# Altium PCB Electrode_Ribbon_PCB_v3.1.PcbDoc (part 5 of 5)
Units mil, origin at the board's own origin, x right, y up, seen from the top; angles counter-clockwise.
Board outline 8303.83 x 5482.84 mil, 2 copper layers (Top Layer, Bottom Layer), stack 3.556 mil thick; 265 components, 171 nets, 720 pads, 346 vias.
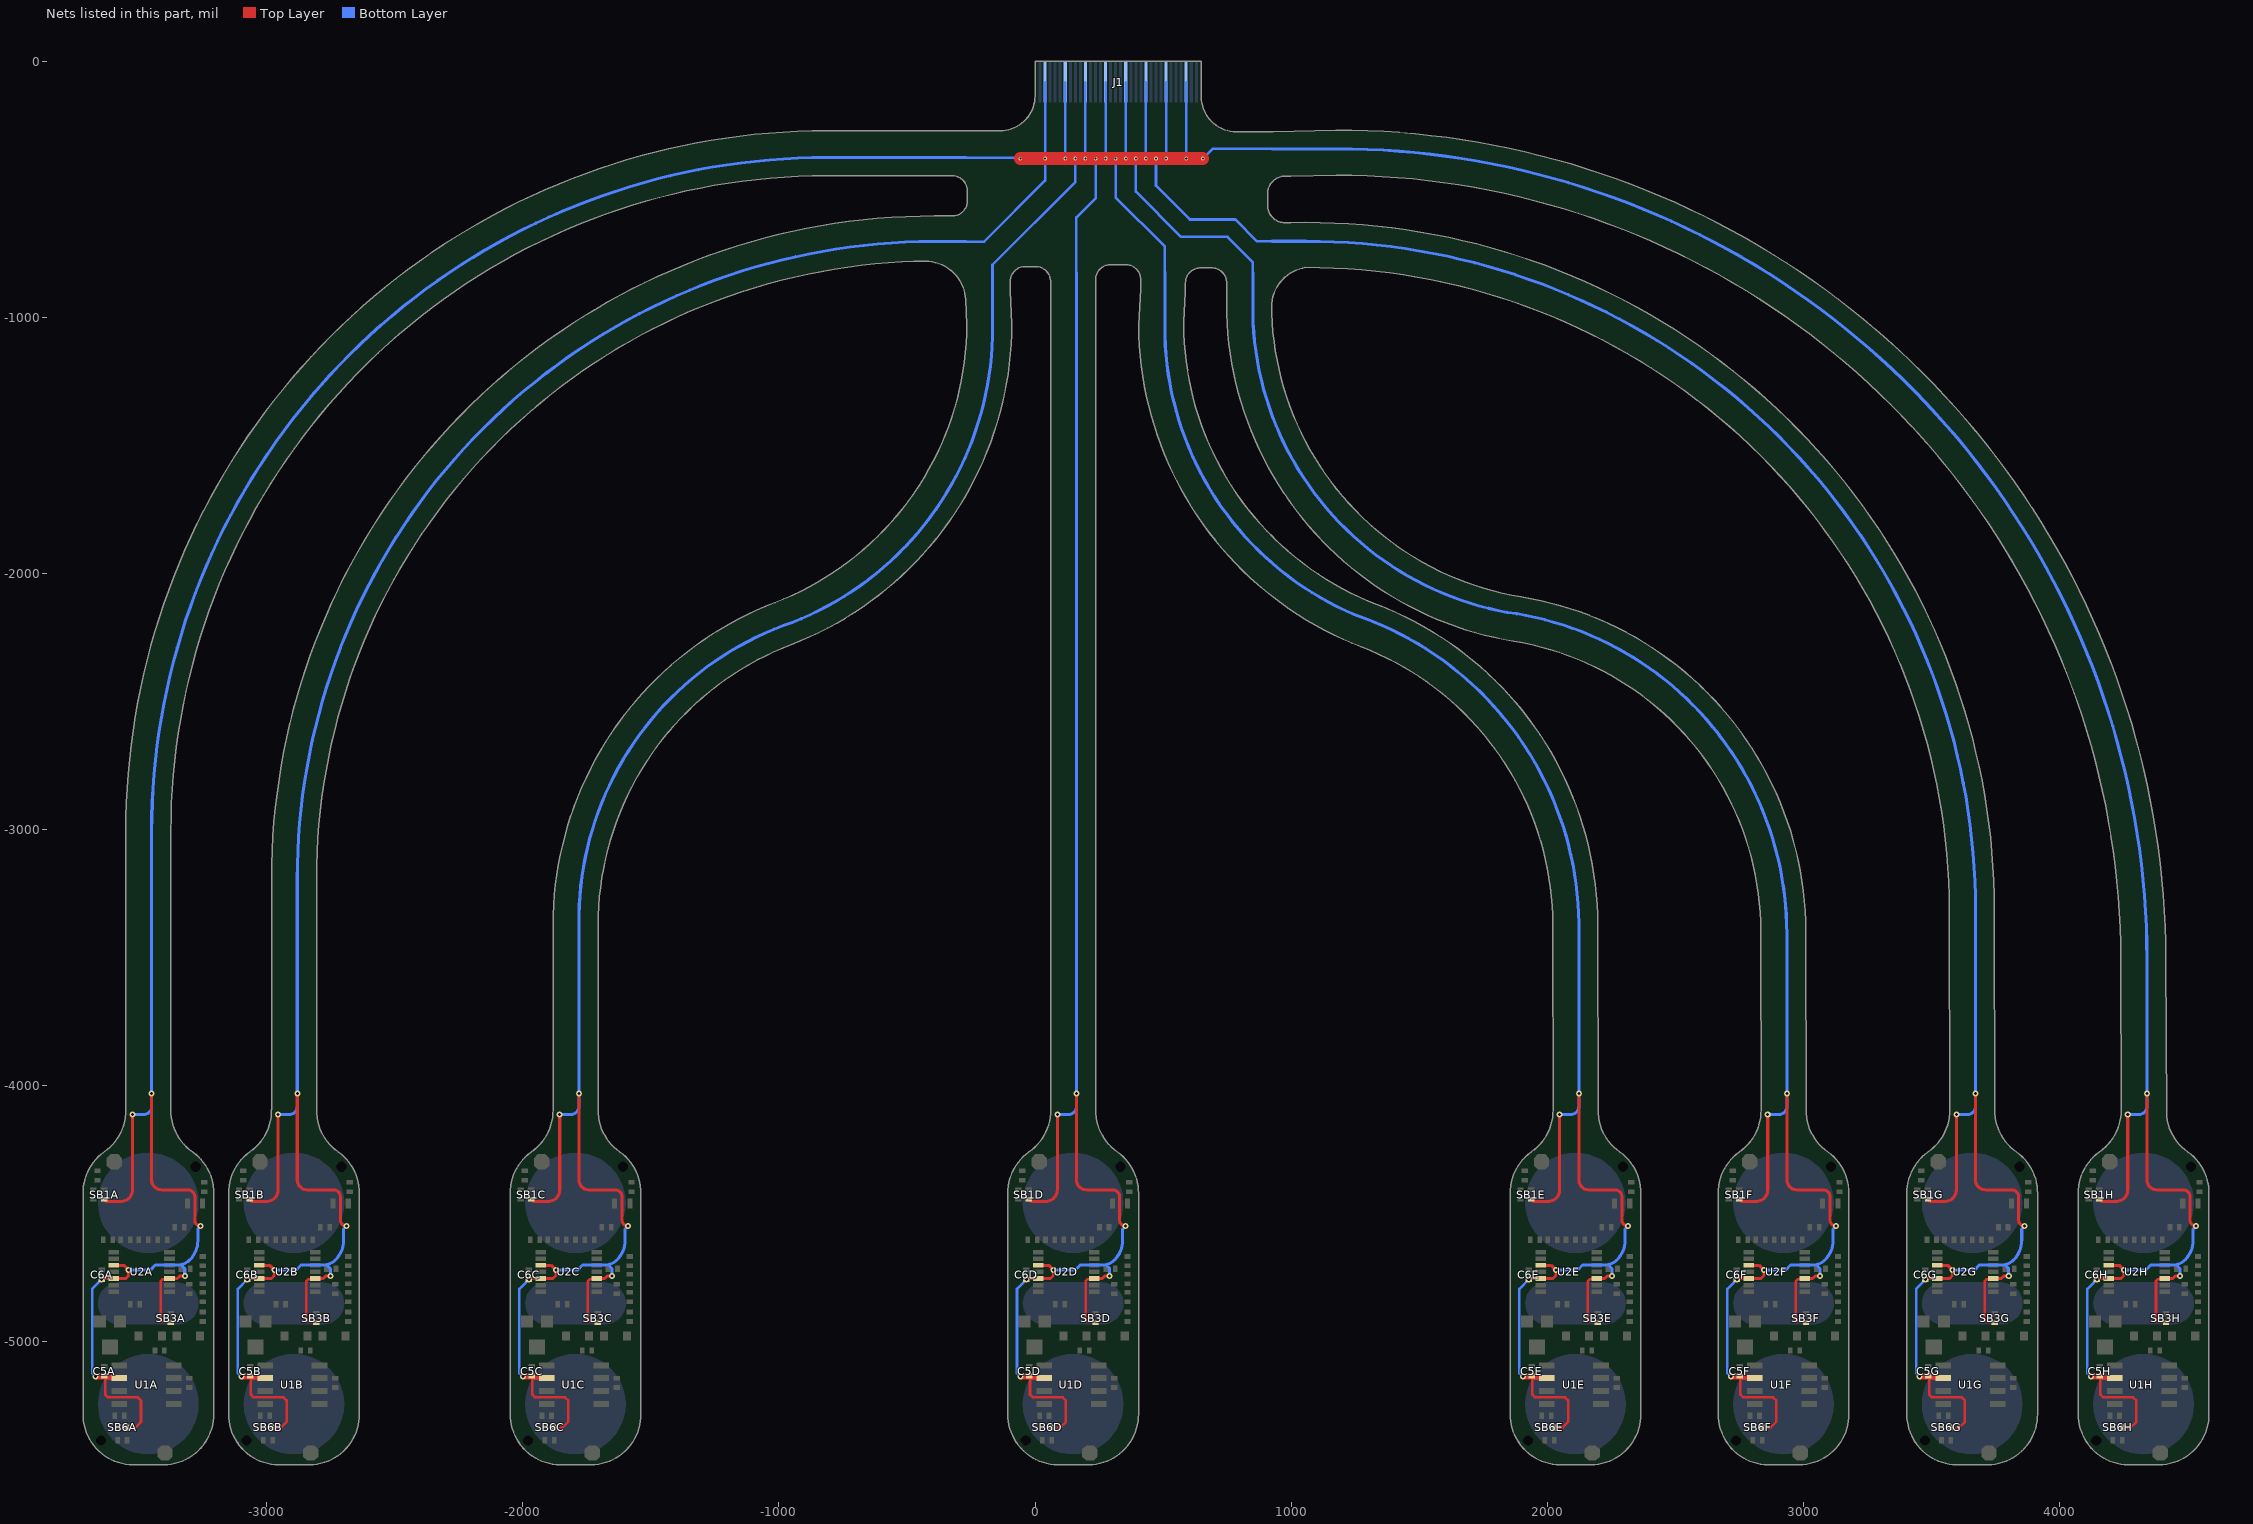
[diagram p4: the nets of this part, all layers, seen from the top]

## Via types
v1: diameter 23.62, hole 11.81, Top Layer to Bottom Layer, tented both sides, 304 vias
v2: diameter 13.78, hole 7.87, Top Layer to Bottom Layer, 42 vias

## Nets (pads, with @x,y where several pads share a name; then routed paths per layer and width w, separated by ;. In a path a pad name is that pad's centre, name@x,y a point inside that pad or via, vN(x,y) a via of type N, cw(c..) or ccw(c..) an arc to the next point about the centre after c; other vN are vias at no path point) (continued)
VREF_GND: C5A.2 C5B.2 C5C.2 C5D.2 C5E.2 C5F.2 C5G.2 C5H.2 C6A.2 C6B.2 C6C.2 C6D.2 C6E.2 C6F.2 C6G.2 C6H.2 J1.2 J1.6 J1.10 J1.14 J1.18 J1.22 J1.26 J1.30 SB1A.1 SB1B.1 SB1C.1 SB1D.1 SB1E.1 SB1F.1 SB1G.1 SB1H.1 SB3A.2 SB3B.2 SB3C.2 SB3D.2 SB3E.2 SB3F.2 SB3G.2 SB3H.2 SB6A.2 SB6B.2 SB6C.2 SB6D.2 SB6E.2 SB6F.2 SB6G.2 SB6H.2 U1A.6 U1B.6 U1C.6 U1D.6 U1E.6 U1F.6 U1G.6 U1H.6 U2A.3 U2A.10 U2A.12 U2B.3 U2B.10 U2B.12 U2C.3 U2C.10 U2C.12 U2D.3 U2D.10 U2D.12 U2E.3 U2E.10 U2E.12 U2F.3 U2F.10 U2F.12 U2G.3 U2G.10 U2G.12 U2H.3 U2H.10 U2H.12 | length 67756
  Top Layer w10: C5A.2@-3636.37,-5127.78 -3631.87,-5132.28 C5A.2@-3631.87,-5136.28 ; C5A.2@-3634.89,-5140.57 -3634.89,-5139.35 C5A.2@-3634.89,-5136.28 ; C5A.2@-3631.87,-5140.57 -3631.87,-5142.28 -3631.87,-5208.78 -3620.87,-5219.78 -3503.89,-5219.78 -3491.89,-5231.78 -3491.89,-5315.28 -3514.14,-5337.53 -3525.39,-5337.53 ; U2A.3@-3379.64,-4755.37 -3382.86,-4758.6 -3408.14,-4758.6 -3414.89,-4765.35 -3414.89,-4918.43 -3409.03,-4924.28 -3379.89,-4924.28 SB3A.2@-3375.89,-4928.28 ; C5B.2@-3067.4,-5127.78 -3062.9,-5132.28 C5B.2@-3062.9,-5136.28 ; C5B.2@-3065.92,-5140.57 -3065.92,-5139.35 C5B.2@-3065.92,-5136.28 ; C5B.2@-3062.9,-5140.57 -3062.9,-5142.28 -3062.9,-5208.78 -3051.9,-5219.78 -2934.92,-5219.78 -2922.92,-5231.78 -2922.92,-5315.28 -2945.17,-5337.53 -2956.42,-5337.53 ; U2B.3@-2810.66,-4755.37 -2813.88,-4758.59 -2839.16,-4758.59 -2845.92,-4765.35 -2845.92,-4918.43 -2840.06,-4924.28 -2810.92,-4924.28 SB3B.2@-2806.92,-4928.28 ; C5C.2@-1967.61,-5127.78 -1963.11,-5132.28 C5C.2@-1963.11,-5136.28 ; C5C.2@-1966.13,-5140.57 -1966.13,-5139.35 C5C.2@-1966.13,-5136.28 ; C5C.2@-1963.11,-5140.57 -1963.11,-5142.28 -1963.11,-5208.78 -1952.11,-5219.78 -1835.13,-5219.78 -1823.13,-5231.78 -1823.13,-5315.28 -1845.38,-5337.53 -1856.63,-5337.53 ; U2C.3@-1710.88,-4755.37 -1714.1,-4758.6 -1739.38,-4758.6 -1746.13,-4765.35 -1746.13,-4918.43 -1740.27,-4924.28 -1711.13,-4924.28 SB3C.2@-1707.13,-4928.28 ; C5D.2@-24.13,-5127.78 -19.63,-5132.28 C5D.2@-19.63,-5136.28 ; C5D.2@-22.65,-5140.57 -22.65,-5139.35 C5D.2@-22.65,-5136.28 ; C5D.2@-19.63,-5140.57 -19.63,-5142.28 -19.63,-5208.78 -8.63,-5219.78 108.35,-5219.78 120.35,-5231.78 120.35,-5315.28 98.1,-5337.53 86.85,-5337.53 ; U2D.3@232.61,-4755.37 229.39,-4758.59 204.1,-4758.59 197.35,-4765.35 197.35,-4918.43 203.21,-4924.28 232.35,-4924.28 SB3D.2@236.35,-4928.28 ; C5E.2@1938.04,-5127.78 1942.54,-5132.28 C5E.2@1942.54,-5136.28 ; C5E.2@1939.52,-5140.57 1939.52,-5139.35 C5E.2@1939.52,-5136.28 ; C5E.2@1942.54,-5140.57 1942.54,-5142.28 1942.54,-5208.78 1953.54,-5219.78 2070.52,-5219.78 2082.52,-5231.78 2082.52,-5315.28 2060.27,-5337.53 2049.02,-5337.53 ; U2E.3@2194.77,-4755.37 2191.55,-4758.6 2166.27,-4758.6 2159.52,-4765.35 2159.52,-4918.43 2165.37,-4924.28 2194.52,-4924.28 SB3E.2@2198.52,-4928.28 ; C5F.2@2750.75,-5127.79 2755.25,-5132.29 C5F.2@2755.25,-5136.29 ; C5F.2@2752.23,-5140.57 2752.23,-5139.35 C5F.2@2752.23,-5136.29 ; C5F.2@2755.25,-5140.57 2755.25,-5142.29 2755.25,-5208.79 2766.25,-5219.79 2883.23,-5219.79 2895.23,-5231.79 2895.23,-5315.29 2872.98,-5337.54 2861.73,-5337.54 ; U2F.3@3007.48,-4755.38 3004.26,-4758.6 2978.98,-4758.6 2972.23,-4765.35 2972.23,-4918.43 2978.09,-4924.29 3007.23,-4924.29 SB3F.2@3011.23,-4928.29 ; C5G.2@3487.5,-5127.78 3492,-5132.28 C5G.2@3492,-5136.28 ; C5G.2@3488.98,-5140.57 3488.98,-5139.35 C5G.2@3488.98,-5136.28 ; C5G.2@3492,-5140.57 3492,-5142.28 3492,-5208.78 3503,-5219.78 3619.98,-5219.78 3631.98,-5231.78 3631.98,-5315.28 3609.73,-5337.53 3598.48,-5337.53 ; U2G.3@3744.23,-4755.37 3741.01,-4758.59 3715.73,-4758.59 3708.98,-4765.35 3708.98,-4918.43 3714.84,-4924.28 3743.98,-4924.28 SB3G.2@3747.98,-4928.28 ; C5H.2@4156.97,-5127.78 4161.47,-5132.28 C5H.2@4161.47,-5136.28 ; C5H.2@4158.45,-5140.57 4158.45,-5139.35 C5H.2@4158.45,-5136.28 ; C5H.2@4161.47,-5140.57 4161.47,-5142.28 4161.47,-5208.78 4172.47,-5219.78 4289.45,-5219.78 4301.45,-5231.78 4301.45,-5315.28 4279.2,-5337.53 4267.95,-5337.53 ; U2H.3@4413.71,-4755.38 4410.49,-4758.6 4385.2,-4758.6 4378.45,-4765.35 4378.45,-4918.43 4384.31,-4924.28 4413.45,-4924.28 SB3H.2@4417.45,-4928.28
  Top Layer w12: v1(-3645.89,-4759.28) -3642.39,-4759.28 -3638.48,-4755.37 U2A.12@-3599.12,-4755.37 -3551.48,-4755.37 -3539.89,-4743.78 v1(-3539.89,-4722.78) -3558.48,-4704.19 U2A.10@-3599.12,-4704.19 ; SB1A.1@-3635.89,-4446.28 -3627.26,-4454.92 -3571.37,-4454.92 ccw(c-3571.37,-4408.71) -3559.93,-4453.48 ccw(c-3571.37,-4408.71) -3526.6,-4420.14 ccw(c-3571.37,-4408.71) -3525.16,-4408.71 v1(-3525.16,-4114.66) ; v1(-3450.17,-4033) -3450.45,-4033.28 -3450.45,-4370.28 ccw(c-3411.82,-4370.28) -3411.82,-4408.92 -3309.62,-4408.92 cw(c-3309.62,-4436.78) -3298.03,-4411.44 cw(c-3309.62,-4436.78) -3284.28,-4425.19 cw(c-3309.62,-4436.78) -3281.76,-4436.78 -3281.76,-4527.92 ccw(c-3258.89,-4527.92) v1(-3258.89,-4550.78) ; U2A.3@-3380.62,-4755.37 -3379.64,-4755.37 -3349.48,-4755.37 -3340.48,-4746.37 v1(-3320.57,-4746.37) ; v1(-3076.92,-4759.28) -3073.42,-4759.28 -3069.51,-4755.37 U2B.12@-3030.15,-4755.37 -2982.51,-4755.37 -2970.92,-4743.78 v1(-2970.92,-4722.78) -2989.51,-4704.19 U2B.10@-3030.15,-4704.19 ; SB1B.1@-3066.92,-4446.28 -3058.28,-4454.92 -3002.4,-4454.92 ccw(c-3002.4,-4408.71) -2990.96,-4453.48 ccw(c-3002.4,-4408.71) -2957.62,-4420.14 ccw(c-3002.4,-4408.71) -2956.19,-4408.71 v1(-2956.19,-4114.66) ; v1(-2881.19,-4033) -2881.47,-4033.28 -2881.47,-4370.28 ccw(c-2842.84,-4370.28) -2842.84,-4408.92 -2740.65,-4408.92 cw(c-2740.65,-4436.78) -2729.06,-4411.44 cw(c-2740.65,-4436.78) -2715.3,-4425.19 cw(c-2740.65,-4436.78) -2712.78,-4436.78 -2712.78,-4527.92 ccw(c-2689.92,-4527.92) v1(-2689.92,-4550.78) ; U2B.3@-2811.64,-4755.37 -2810.66,-4755.37 -2780.51,-4755.37 -2771.5,-4746.37 v1(-2751.59,-4746.37) ; v1(-1977.13,-4759.28) -1973.63,-4759.28 -1969.72,-4755.37 U2C.12@-1930.36,-4755.37 -1882.72,-4755.37 -1871.13,-4743.78 v1(-1871.13,-4722.78) -1889.72,-4704.19 U2C.10@-1930.36,-4704.19 ; SB1C.1@-1967.13,-4446.28 -1958.5,-4454.92 -1902.61,-4454.92 ccw(c-1902.61,-4408.71) -1891.17,-4453.48 ccw(c-1902.61,-4408.71) -1857.84,-4420.14 ccw(c-1902.61,-4408.71) -1856.4,-4408.71 v1(-1856.4,-4114.66) ; v1(-1781.41,-4033) -1781.69,-4033.28 -1781.69,-4370.28 ccw(c-1743.06,-4370.28) -1743.06,-4408.92 -1640.86,-4408.92 cw(c-1640.86,-4436.78) -1629.27,-4411.44 cw(c-1640.86,-4436.78) -1615.52,-4425.19 cw(c-1640.86,-4436.78) -1613,-4436.78 -1613,-4527.92 ccw(c-1590.13,-4527.92) v1(-1590.13,-4550.78) ; U2C.3@-1711.86,-4755.37 -1710.88,-4755.37 -1680.72,-4755.37 -1671.72,-4746.37 v1(-1651.81,-4746.37) ; v1(-33.65,-4759.28) -30.15,-4759.28 -26.24,-4755.37 U2D.12@13.12,-4755.37 60.76,-4755.37 72.35,-4743.78 v1(72.35,-4722.78) 53.76,-4704.19 U2D.10@13.12,-4704.19 ; SB1D.1@-23.65,-4446.28 -15.02,-4454.92 40.87,-4454.92 ccw(c40.87,-4408.7) 52.31,-4453.48 ccw(c40.87,-4408.7) 85.64,-4420.14 ccw(c40.87,-4408.7) 87.08,-4408.7 v1(87.08,-4114.66) ; v1(162.07,-4033) 161.79,-4033.28 161.79,-4370.28 ccw(c200.43,-4370.28) 200.43,-4408.91 302.62,-4408.91 cw(c302.62,-4436.78) 314.21,-4411.44 cw(c302.62,-4436.78) 327.96,-4425.19 cw(c302.62,-4436.78) 330.49,-4436.78 330.49,-4527.92 ccw(c353.35,-4527.92) v1(353.35,-4550.78) ; U2D.3@231.62,-4755.37 232.61,-4755.37 262.76,-4755.37 271.77,-4746.37 v1(291.68,-4746.37) ; v1(1928.52,-4759.28) 1932.02,-4759.28 1935.92,-4755.37 U2E.12@1975.28,-4755.37 2022.92,-4755.37 2034.52,-4743.78 v1(2034.52,-4722.78) 2015.93,-4704.19 U2E.10@1975.28,-4704.19 ; SB1E.1@1938.52,-4446.28 1947.15,-4454.92 2003.04,-4454.92 ccw(c2003.04,-4408.71) 2014.47,-4453.48 ccw(c2003.04,-4408.71) 2047.81,-4420.14 ccw(c2003.04,-4408.71) 2049.25,-4408.71 v1(2049.25,-4114.66) ; v1(2124.24,-4033) 2123.96,-4033.28 2123.96,-4370.28 ccw(c2162.59,-4370.28) 2162.59,-4408.92 2264.78,-4408.92 cw(c2264.78,-4436.78) 2276.38,-4411.44 cw(c2264.78,-4436.78) 2290.13,-4425.19 cw(c2264.78,-4436.78) 2292.65,-4436.78 2292.65,-4527.92 ccw(c2315.52,-4527.92) v1(2315.52,-4550.78) ; U2E.3@2193.79,-4755.37 2194.77,-4755.37 2224.92,-4755.37 2233.93,-4746.37 v1(2253.84,-4746.37) ; v1(2741.23,-4759.29) 2744.73,-4759.29 2748.64,-4755.38 U2F.12@2788,-4755.38 2835.64,-4755.38 2847.23,-4743.79 v1(2847.23,-4722.79) 2828.64,-4704.2 U2F.10@2788,-4704.2 ; SB1F.1@2751.23,-4446.29 2759.86,-4454.92 2815.75,-4454.92 ccw(c2815.75,-4408.71) 2827.19,-4453.48 ccw(c2815.75,-4408.71) 2860.52,-4420.15 ccw(c2815.75,-4408.71) 2861.96,-4408.71 v1(2861.96,-4114.67) ; v1(2936.95,-4033.01) 2936.67,-4033.29 2936.67,-4370.29 ccw(c2975.3,-4370.29) 2975.3,-4408.92 3077.5,-4408.92 cw(c3077.5,-4436.79) 3089.09,-4411.45 cw(c3077.5,-4436.79) 3102.84,-4425.2 cw(c3077.5,-4436.79) 3105.37,-4436.79 3105.37,-4527.93 ccw(c3128.23,-4527.93) v1(3128.23,-4550.79) ; U2F.3@3006.5,-4755.38 3007.48,-4755.38 3037.64,-4755.38 3046.64,-4746.38 v1(3066.56,-4746.38) ; v1(3477.98,-4759.28) 3481.48,-4759.28 3485.39,-4755.37 U2G.12@3524.75,-4755.37 3572.39,-4755.37 3583.98,-4743.78 v1(3583.98,-4722.78) 3565.39,-4704.19 U2G.10@3524.75,-4704.19 ; SB1G.1@3487.98,-4446.28 3496.61,-4454.92 3552.5,-4454.92 ccw(c3552.5,-4408.71) 3563.94,-4453.48 ccw(c3552.5,-4408.71) 3597.27,-4420.14 ccw(c3552.5,-4408.71) 3598.71,-4408.71 v1(3598.71,-4114.66) ; v1(3673.7,-4033) 3673.42,-4033.28 3673.42,-4370.28 ccw(c3712.05,-4370.28) 3712.05,-4408.91 3814.25,-4408.91 cw(c3814.25,-4436.78) 3825.84,-4411.44 cw(c3814.25,-4436.78) 3839.59,-4425.19 cw(c3814.25,-4436.78) 3842.11,-4436.78 3842.11,-4527.92 ccw(c3864.98,-4527.92) v1(3864.98,-4550.78) ; U2G.3@3743.25,-4755.37 3744.23,-4755.37 3774.39,-4755.37 3783.39,-4746.37 v1(3803.3,-4746.37) ; v1(4147.45,-4759.28) 4150.95,-4759.28 4154.86,-4755.38 U2H.12@4194.22,-4755.38 4241.86,-4755.38 4253.45,-4743.78 v1(4253.45,-4722.78) 4234.86,-4704.19 U2H.10@4194.22,-4704.19 ; SB1H.1@4157.45,-4446.28 4166.08,-4454.92 4221.97,-4454.92 ccw(c4221.97,-4408.71) 4233.41,-4453.48 ccw(c4221.97,-4408.71) 4266.74,-4420.14 ccw(c4221.97,-4408.71) 4268.18,-4408.71 v1(4268.18,-4114.66) ; v1(4343.17,-4033) 4342.9,-4033.28 4342.9,-4370.28 ccw(c4381.53,-4370.28) 4381.53,-4408.92 4483.72,-4408.92 cw(c4483.72,-4436.78) 4495.31,-4411.44 cw(c4483.72,-4436.78) 4509.06,-4425.19 cw(c4483.72,-4436.78) 4511.59,-4436.78 4511.59,-4527.92 ccw(c4534.45,-4527.92) v1(4534.45,-4550.78) ; U2H.3@4412.72,-4755.38 4413.71,-4755.38 4443.86,-4755.38 4452.87,-4746.37 v1(4472.78,-4746.37)
  Top Layer w20: v1(-3668.89,-5138.78) -3668.33,-5139.35 -3634.89,-5139.35 -3634.81,-5139.35 -3631.87,-5142.28 U1A.6@-3602.89,-5142.28 ; v1(-3099.92,-5138.78) -3099.35,-5139.35 -3065.92,-5139.35 -3065.83,-5139.35 -3062.9,-5142.28 U1B.6@-3033.92,-5142.28 ; v1(-2000.13,-5138.78) -1999.57,-5139.35 -1966.13,-5139.35 -1966.05,-5139.35 -1963.11,-5142.28 U1C.6@-1934.13,-5142.28 ; v1(-56.65,-5138.78) -56.08,-5139.35 -22.65,-5139.35 -22.56,-5139.35 -19.63,-5142.28 U1D.6@9.35,-5142.28 ; v1(1905.52,-5138.78) 1906.08,-5139.35 1939.52,-5139.35 1939.6,-5139.35 1942.54,-5142.28 U1E.6@1971.52,-5142.28 ; v1(2718.23,-5138.79) 2718.79,-5139.35 2752.23,-5139.35 2752.31,-5139.35 2755.25,-5142.29 U1F.6@2784.23,-5142.29 ; v1(3454.98,-5138.78) 3455.54,-5139.35 3488.98,-5139.35 3489.06,-5139.35 3492,-5142.28 U1G.6@3520.98,-5142.28 ; v1(4124.45,-5138.78) 4125.02,-5139.35 4158.45,-5139.35 4158.54,-5139.35 4161.47,-5142.28 U1H.6@4190.45,-5142.28
  Top Layer w50: v2(-57.25,-381.11) -56.95,-380.81 v2(39.64,-380.81) v2(118.31,-380.81) ; v2@118.31,-381.11 v2(236.42,-381.11) v2(315.16,-381.11) 655.05,-381.11 v2@655.05,-380.81
  Bottom Layer w10: v1(-3668.89,-5138.78) -3670.57,-5137.1 -3682.57,-5125.1 -3682.57,-4795.97 v1(-3645.89,-4759.28) ; v1(-3099.92,-5138.78) -3101.6,-5137.1 -3113.6,-5125.1 -3113.6,-4795.96 v1(-3076.92,-4759.28) ; v1(-2000.13,-5138.78) -2001.81,-5137.1 -2013.81,-5125.1 -2013.81,-4795.97 v1(-1977.13,-4759.28) ; -269.25,-705.11 -198.16,-705.11 39.64,-467.31 v2(39.64,-380.81) 39.54,-380.71 39.54,-83.12 J1.2@39.44,-83.01 ; -269.25,-377.11 -61.25,-377.11 v2(-57.25,-381.11) ; -165.95,-826.74 -165.95,-795.86 157.68,-472.23 v2@157.68,-380.95 ; v1(-56.65,-5138.78) -58.33,-5137.1 -70.33,-5125.1 -70.33,-4795.96 v1(-33.65,-4759.28) ; v2@118.18,-380.81 J1.6@118.18,-83.01 ; 161.55,-826.74 161.55,-611.28 236.42,-536.4 v2@236.42,-381.25 ; v2@196.92,-380.81 J1.10@196.92,-83.01 ; v2@275.66,-380.81 J1.14@275.66,-83.01 ; v2@315.03,-381.11 315.16,-381.25 315.16,-532.44 506.91,-724.19 506.91,-823.9 ; v2@354.4,-380.81 J1.18@354.4,-83.01 ; v2@393.9,-380.95 393.9,-510.26 570.75,-687.11 751.75,-687.11 850.85,-786.21 850.85,-826.74 ; v2@433.14,-380.81 J1.22@433.14,-83.01 ; v2@472.51,-380.81 472.51,-486.91 604.71,-619.11 782.8,-619.11 867.8,-704.11 926.47,-704.11 ; v2@511.88,-380.81 J1.26@511.88,-83.01 ; v2@590.62,-380.81 J1.30@590.62,-83.01 ; v2(655.75,-380.81) 693.46,-343.11 925.05,-343.11 ; v1(1905.52,-5138.78) 1903.83,-5137.1 1891.83,-5125.1 1891.83,-4795.97 v1(1928.52,-4759.28) ; v1(2718.23,-5138.79) 2716.55,-5137.11 2704.55,-5125.11 2704.55,-4795.97 v1(2741.23,-4759.29) ; v1(3454.98,-5138.78) 3453.3,-5137.1 3441.3,-5125.1 3441.3,-4795.96 v1(3477.98,-4759.28) ; v1(4124.45,-5138.78) 4122.77,-5137.1 4110.77,-5125.1 4110.77,-4795.97 v1(4147.45,-4759.28)
  Bottom Layer w12: v1(-3539.89,-4722.78) -3539.7,-4722.6 -3455.7,-4722.6 -3435.89,-4702.78 -3357.93,-4702.78 ; v1(-3525.16,-4114.66) -3481.05,-4114.66 ccw(c-3481.05,-4083.78) -3450.17,-4083.78 v1(-3450.17,-4033) ; v1@-3450.45,-4032.72 -3450.45,-3009.11 cw(c-816.35,-3011.22) -814.25,-377.11 -269.25,-377.11 ; -3355.73,-4702.78 ccw(c-3355.73,-4596.94) -3335.18,-4700.77 ccw(c-3347.99,-4636.05) -3301.34,-4682.7 ccw(c-3377.26,-4606.78) -3269.89,-4606.78 -3269.89,-4561.78 v1(-3258.89,-4550.78) ; -3334.75,-4702.93 -3320.88,-4716.8 -3320.88,-4746.06 v1(-3320.57,-4746.37) ; v1(-2970.92,-4722.78) -2970.73,-4722.59 -2886.73,-4722.59 -2866.92,-4702.78 -2788.96,-4702.78 ; v1(-2956.19,-4114.66) -2912.08,-4114.66 ccw(c-2912.08,-4083.78) -2881.19,-4083.78 v1(-2881.19,-4033) ; v1@-2881.47,-4033 -2881.47,-3193.7 cw(c-395.57,-3191.02) -398.25,-705.11 -269.25,-705.11 ; -2786.76,-4702.78 ccw(c-2786.76,-4596.94) -2766.2,-4700.77 ccw(c-2779.01,-4636.05) -2732.36,-4682.7 ccw(c-2808.28,-4606.78) -2700.92,-4606.78 -2700.92,-4561.78 v1(-2689.92,-4550.78) ; -2765.77,-4702.93 -2751.9,-4716.8 -2751.9,-4746.06 v1(-2751.59,-4746.37) ; v1(-1871.13,-4722.78) -1870.94,-4722.6 -1786.94,-4722.6 -1767.13,-4702.78 -1689.17,-4702.78 ; v1(-1856.4,-4114.66) -1812.29,-4114.66 ccw(c-1812.29,-4083.78) -1781.41,-4083.78 v1(-1781.41,-4033) ; v1@-1781.47,-4033 -1781.47,-3373.08 cw(c-551.39,-3357.23) -948.32,-2192.83 ccw(c-1396.56,-1046.74) -165.95,-1039.43 -165.95,-826.74 ; -1686.97,-4702.78 ccw(c-1686.97,-4596.94) -1666.42,-4700.77 ccw(c-1679.23,-4636.05) -1632.58,-4682.7 ccw(c-1708.5,-4606.78) -1601.13,-4606.78 -1601.13,-4561.78 v1(-1590.13,-4550.78) ; -1665.99,-4702.93 -1652.12,-4716.8 -1652.12,-4746.06 v1(-1651.81,-4746.37) ; v1(72.35,-4722.78) 72.54,-4722.59 156.54,-4722.59 176.35,-4702.78 254.31,-4702.78 ; v1(87.08,-4114.66) 131.19,-4114.66 ccw(c131.19,-4083.78) 162.07,-4083.78 v1(162.07,-4033) ; v1@161.55,-4033 161.55,-826.74 ; 256.51,-4702.78 ccw(c256.51,-4596.94) 277.07,-4700.77 ccw(c264.25,-4636.05) 310.9,-4682.7 ccw(c234.99,-4606.78) 342.35,-4606.78 342.35,-4561.78 v1(353.35,-4550.78) ; 277.49,-4702.93 291.37,-4716.8 291.37,-4746.06 v1(291.68,-4746.37) ; 506.91,-823.9 506.91,-1034.67 ccw(c1725.55,-1041.4) 1247.45,-2162.35 cw(c836.36,-3382.75) 2124.05,-3368.16 v1@2124.05,-4033 ; 850.85,-826.74 850.85,-945.96 ccw(c2058.8,-964.26) 1844.37,-2153.17 cw(c1674.62,-3400.94) 2623.44,-2573 cw(c1666.48,-3408.05) 2936.55,-3408.87 v1@2936.55,-4033.01 ; 925.05,-343.11 1176.75,-343.11 cw(c1178.9,-3507.26) 4343.05,-3505.11 v1@4343.05,-4033 ; 926.47,-704.11 1057.75,-704.11 cw(c1060.15,-3317.51) 3673.55,-3315.11 v1@3673.55,-4033 ; v1(2034.52,-4722.78) 2034.7,-4722.59 2118.7,-4722.59 2138.52,-4702.78 2216.48,-4702.78 ; v1(2049.25,-4114.66) 2093.35,-4114.66 ccw(c2093.35,-4083.78) 2124.24,-4083.78 v1(2124.24,-4033) ; 2218.68,-4702.78 ccw(c2218.68,-4596.94) 2239.23,-4700.77 ccw(c2226.42,-4636.05) 2273.07,-4682.7 ccw(c2197.15,-4606.78) 2304.52,-4606.78 2304.52,-4561.78 v1(2315.52,-4550.78) ; 2239.66,-4702.93 2253.53,-4716.8 2253.53,-4746.06 v1(2253.84,-4746.37) ; v1(2847.23,-4722.79) 2847.42,-4722.6 2931.42,-4722.6 2951.23,-4702.79 3029.19,-4702.79 ; v1(2861.96,-4114.67) 2906.07,-4114.67 ccw(c2906.07,-4083.78) 2936.95,-4083.78 v1(2936.95,-4033.01) ; 3031.39,-4702.79 ccw(c3031.39,-4596.95) 3051.94,-4700.77 ccw(c3039.13,-4636.06) 3085.78,-4682.71 ccw(c3009.87,-4606.79) 3117.23,-4606.79 3117.23,-4561.79 v1(3128.23,-4550.79) ; 3052.37,-4702.93 3066.25,-4716.81 3066.25,-4746.07 v1(3066.56,-4746.38) ; v1(3583.98,-4722.78) 3584.17,-4722.59 3668.17,-4722.59 3687.98,-4702.78 3765.94,-4702.78 ; v1(3598.71,-4114.66) 3642.82,-4114.66 ccw(c3642.82,-4083.78) 3673.7,-4083.78 v1(3673.7,-4033) ; 3768.14,-4702.78 ccw(c3768.14,-4596.94) 3788.69,-4700.77 ccw(c3775.88,-4636.05) 3822.53,-4682.7 ccw(c3746.61,-4606.78) 3853.98,-4606.78 3853.98,-4561.78 v1(3864.98,-4550.78) ; 3789.12,-4702.93 3802.99,-4716.8 3802.99,-4746.06 v1(3803.3,-4746.37) ; v1(4253.45,-4722.78) 4253.64,-4722.6 4337.64,-4722.6 4357.45,-4702.78 4435.41,-4702.78 ; v1(4268.18,-4114.66) 4312.29,-4114.66 ccw(c4312.29,-4083.78) 4343.17,-4083.78 v1(4343.17,-4033) ; 4437.61,-4702.78 ccw(c4437.61,-4596.94) 4458.17,-4700.77 ccw(c4445.35,-4636.05) 4492.01,-4682.7 ccw(c4416.09,-4606.78) 4523.45,-4606.78 4523.45,-4561.78 v1(4534.45,-4550.78) ; 4458.6,-4702.93 4472.47,-4716.8 4472.47,-4746.06 v1(4472.78,-4746.37)
  Bottom Layer w15: v1@-3450.45,-4032.72 v1(-3450.17,-4033)
  other v2: 157.68,-380.81 197.05,-380.81 275.79,-380.81 354.53,-380.81 393.9,-380.81 433.27,-380.81 472.64,-380.81 512.01,-380.81 590.75,-380.81

## Polygon pours and split planes (outlines as drawn)
-VCC_3V3 on Top Layer "-VCC_3V3_L01_P000" (hatched 90Degree grid 20 track 5, pour order 0): -270.54,-316.41 cw(c-251.45,-316.41) -251.45,-297.31 -122.38,-297.31 ccw(c-105.68,-180.64) 11.03,-197.05 cw(c40.75,-201.11) 40.75,-171.11 607.76,-171.11 cw(c595.62,-215.75) 632.15,-187.38 ccw(c770.29,-164.62) 790.75,-303.11 908.32,-303.11 cw(c910.54,-323.32) 930.75,-321.11 930.75,-391.11 930.75,-421.11 cw(c900.82,-421.14) 922,-442.29 ccw(c922.13,-483.67) 880.75,-483.68 880.75,-592.97 ccw(c920.72,-597.03) 916.86,-637.01 cw(c907.51,-659.63) 930.13,-650.28 930.13,-675.87 cw(c885.68,-680.49) 930.37,-680.73 930.37,-717.21 cw(c912.09,-720.98) 930.75,-721.11 930.75,-781.11 cw(c880.77,-781.13) 880.75,-831.11 800.75,-831.11 cw(c800.75,-801.12) 770.75,-801.11 ccw(c740.77,-801.1) 740.75,-771.11 590.75,-771.11 ccw(c600.73,-797.56) 572.53,-799.34 cw(c540.77,-799.36) 540.75,-831.11 470.75,-831.11 cw(c470.75,-799.35) 438.98,-799.34 ccw(c409.81,-798.86) 418.82,-771.11 250.75,-771.11 ccw(c250.74,-801.1) 220.75,-801.11 cw(c190.77,-801.13) 190.75,-831.11 110.75,-831.11 cw(c110.75,-801.12) 80.75,-801.11 ccw(c50.77,-801.1) 50.75,-771.11 -79.25,-771.11 ccw(c-79.26,-801.1) -109.25,-801.11 cw(c-139.23,-801.13) -139.25,-831.11 -219.25,-831.11 cw(c-219.25,-781.12) -269.25,-781.11 -269.25,-641.11 cw(c-249.25,-641.11) -263.39,-626.97 ccw(c-266.82,-596.4) -236.25,-592.97 -236.25,-468.11 ccw(c-268.03,-467.3) -258.04,-437.11 cw(c-248.12,-416.69) -270.54,-413.11 -270.54,-391.11

## Other copper
Top Layer:
  rectangle net VREF_GND: 1925.5,-4475.78 1985.52,-4436.78
  rectangle net IN2NH: 4522.45,-4751.78 4561.47,-4695.78
  rectangle net NetC1H_2: 4485.45,-4730.78 4516.45,-4708.78
  rectangle net NetD1H_2: 4474.45,-4788.78 4557.45,-4764.78
  rectangle net NetC3H_2: 4514.47,-4857.78 4561.47,-4837.78
  rectangle net NetC3H_2: 4514.47,-4896.78 4561.47,-4837.78
  rectangle net NetR3H_1: 4469.47,-4828.28 4558.47,-4798.78
  rectangle net RECTH: 4526.45,-4679.78 4557.45,-4641.78
  rectangle net RECTH: 4391.45,-4661.78 4557.45,-4641.78
  rectangle net NetD1H_2: 4500.45,-5008.78 4548.45,-4957.78
  rectangle net NetLED1H_2: 4530.47,-4486.78 4561.47,-4398.78
  rectangle net MeasureH: 4459.45,-4584.78 4493.45,-4442.78
  rectangle net -VCC_3V3: 4135.45,-4736.78 4163.45,-4710.78
  rectangle net NetR11H_1: 4098.23,-4419.42 4176.45,-4399.92
  rectangle net VREF_GND: 4144.44,-4475.78 4204.45,-4436.78
  rectangle net -VCC_3V3: 4131.45,-5113.78 4268.45,-5080.78
  region net VCC_3V3: 4227.45,-5249.78 4227.45,-5307.78 4278.45,-5307.78 4278.45,-5249.78
  rectangle net VREF_GND: 4237.45,-5356.78 4298.45,-5318.28
  rectangle net *rgH: 4396.47,-5156.78 4508.45,-5125.78
  rectangle net #rgH: 4396.47,-5206.78 4509.45,-5170.78
  rectangle net VREF_GND: 4112.45,-5162.78 4249.45,-5121.78
  rectangle net VCC_3V3: 4102.45,-5265.78 4278.45,-5231.78
  rectangle net -VCC_3V3: 4078.45,-4531.72 4131.23,-4434.78
  region net -VCC_3V3: 4235.82,-5373.78 4235.82,-5471.78 4271.45,-5471.78 4271.45,-5373.78
  rectangle net NetC1H_2: 4179.45,-5408.78 4219.45,-5277.78
  rectangle net Measure*H: 4148.45,-5039.78 4211.45,-4985.78
  rectangle net VREF_GND: 4372.45,-4937.78 4432.45,-4911.78
  rectangle net SMOOTHH: 4248.47,-4618.78 4303.47,-4590.78
  rectangle net Measure*H: 4162.45,-4858.78 4233.45,-4797.78
  rectangle net Measure*H: 4192.45,-5052.78 4246.45,-4891.78
  rectangle net IN2PH: 4276.45,-5050.78 4356.45,-4964.78
  rectangle net IN2PH: 4276.45,-5050.78 4364.45,-5023.78
  rectangle net NetC4H_2: 4319.47,-4617.78 4375.47,-4571.78
  rectangle net RECTH: 4390.57,-4660.4 4421.57,-4591.78
  rectangle net OUT1H: 4367.45,-5000.78 4458.45,-4944.78
  rectangle net NetR3H_1: 4469.47,-4944.78 4499.47,-4798.78
  rectangle net IN2NG: 3852.98,-4751.78 3892,-4695.78
  rectangle net NetC1G_2: 3815.98,-4730.78 3846.98,-4708.78
  rectangle net NetD1G_2: 3804.98,-4788.78 3887.98,-4764.78
  rectangle net NetC3G_2: 3845,-4857.78 3892,-4837.78
  rectangle net NetC3G_2: 3845,-4896.78 3892,-4837.78
  rectangle net NetR3G_1: 3800,-4828.28 3889,-4798.78
  rectangle net RECTG: 3856.98,-4679.78 3887.98,-4641.78
  rectangle net RECTG: 3721.98,-4661.78 3887.98,-4641.78
  rectangle net NetD1G_2: 3830.98,-5008.78 3878.98,-4957.78
  rectangle net NetLED1G_2: 3861,-4486.78 3892,-4398.78
  rectangle net MeasureG: 3789.98,-4584.78 3823.98,-4442.78
  rectangle net -VCC_3V3: 3465.98,-4736.78 3493.98,-4710.78
  rectangle net NetR11G_1: 3428.75,-4419.42 3506.98,-4399.92
  rectangle net VREF_GND: 3474.96,-4475.78 3534.98,-4436.78
  rectangle net -VCC_3V3: 3461.98,-5113.78 3598.98,-5080.78
  region net VCC_3V3: 3557.98,-5249.78 3557.98,-5307.78 3608.98,-5307.78 3608.98,-5249.78
  rectangle net VREF_GND: 3567.98,-5356.78 3628.98,-5318.28
  rectangle net *rgG: 3727,-5156.78 3838.98,-5125.78
  rectangle net #rgG: 3727,-5206.78 3839.98,-5170.78
  rectangle net VREF_GND: 3442.98,-5162.78 3579.98,-5121.78
  rectangle net VCC_3V3: 3432.98,-5265.78 3608.98,-5231.78
  rectangle net -VCC_3V3: 3408.98,-4532.02 3461.75,-4434.78
  region net -VCC_3V3: 3566.35,-5373.78 3566.35,-5471.78 3601.98,-5471.78 3601.98,-5373.78
  rectangle net NetC1G_2: 3509.98,-5408.78 3549.98,-5277.78
  rectangle net Measure*G: 3478.98,-5039.78 3541.98,-4985.78
  rectangle net VREF_GND: 3702.98,-4937.78 3762.98,-4911.78
  rectangle net SMOOTHG: 3579,-4618.78 3634,-4590.78
  rectangle net Measure*G: 3492.98,-4858.78 3563.98,-4797.78
  rectangle net Measure*G: 3522.98,-5052.78 3576.98,-4891.78
  rectangle net IN2PG: 3606.98,-5050.78 3686.98,-4964.78
  rectangle net IN2PG: 3606.98,-5050.78 3694.98,-5023.78
  rectangle net NetC4G_2: 3650,-4617.78 3706,-4571.78
  rectangle net RECTG: 3721.09,-4660.4 3752.09,-4591.78
  rectangle net OUT1G: 3697.98,-5000.78 3788.98,-4944.78
  rectangle net NetR3G_1: 3800,-4944.78 3830,-4798.78
  rectangle net IN2NF: 3116.23,-4751.79 3155.25,-4695.79
  rectangle net NetC1F_2: 3079.23,-4730.79 3110.23,-4708.79
  rectangle net NetD1F_2: 3068.23,-4788.79 3151.23,-4764.79
  rectangle net NetC3F_2: 3108.25,-4857.79 3155.25,-4837.79
  rectangle net NetC3F_2: 3108.25,-4896.79 3155.25,-4837.79
  rectangle net NetR3F_1: 3063.25,-4828.29 3152.25,-4798.79
  rectangle net RECTF: 3120.23,-4679.79 3151.23,-4641.79
  rectangle net RECTF: 2985.23,-4661.79 3151.23,-4641.79
  rectangle net NetD1F_2: 3094.23,-5008.79 3142.23,-4957.79
  rectangle net NetLED1F_2: 3124.25,-4486.79 3155.25,-4398.79
  rectangle net MeasureF: 3053.23,-4584.79 3087.23,-4442.79
  rectangle net -VCC_3V3: 2729.23,-4736.79 2757.23,-4710.79
  rectangle net NetR11F_1: 2692,-4419.42 2770.23,-4399.92
  rectangle net VREF_GND: 2738.21,-4475.79 2798.23,-4436.79
  rectangle net -VCC_3V3: 2725.23,-5113.79 2862.23,-5080.79
  region net VCC_3V3: 2821.23,-5249.79 2821.23,-5307.79 2872.23,-5307.79 2872.23,-5249.79
  rectangle net VREF_GND: 2831.23,-5356.79 2892.23,-5318.29
  rectangle net *rgF: 2990.25,-5156.79 3102.23,-5125.79
  rectangle net #rgF: 2990.25,-5206.79 3103.23,-5170.79
  rectangle net VREF_GND: 2706.23,-5162.79 2843.23,-5121.79
  rectangle net VCC_3V3: 2696.23,-5265.79 2872.23,-5231.79
  rectangle net -VCC_3V3: 2672.23,-4532.16 2725,-4434.79
  region net -VCC_3V3: 2829.6,-5373.79 2829.6,-5471.79 2865.23,-5471.79 2865.23,-5373.79
  rectangle net NetC1F_2: 2773.23,-5408.79 2813.23,-5277.79
  rectangle net Measure*F: 2742.23,-5039.79 2805.23,-4985.79
  rectangle net VREF_GND: 2966.23,-4937.79 3026.23,-4911.79
  rectangle net SMOOTHF: 2842.25,-4618.79 2897.25,-4590.79
  rectangle net Measure*F: 2756.23,-4858.79 2827.23,-4797.79
  rectangle net Measure*F: 2786.23,-5052.79 2840.23,-4891.79
  rectangle net IN2PF: 2870.23,-5050.79 2950.23,-4964.79
  rectangle net IN2PF: 2870.23,-5050.79 2958.23,-5023.79
  rectangle net NetC4F_2: 2913.25,-4617.79 2969.25,-4571.79
  rectangle net RECTF: 2984.34,-4660.4 3015.34,-4591.79
  rectangle net OUT1F: 2961.23,-5000.79 3052.23,-4944.79
  rectangle net NetR3F_1: 3063.25,-4944.79 3093.25,-4798.79
  rectangle net IN2NE: 2303.52,-4751.78 2342.54,-4695.78
  rectangle net NetC1E_2: 2266.52,-4730.78 2297.52,-4708.78
  rectangle net NetD1E_2: 2255.52,-4788.78 2338.52,-4764.78
  rectangle net NetC3E_2: 2295.54,-4857.78 2342.54,-4837.78
  rectangle net NetC3E_2: 2295.54,-4896.78 2342.54,-4837.78
  rectangle net NetR3E_1: 2250.54,-4828.28 2339.54,-4798.78
  rectangle net RECTE: 2307.52,-4679.78 2338.52,-4641.78
  rectangle net RECTE: 2172.52,-4661.78 2338.52,-4641.78
  rectangle net NetD1E_2: 2281.52,-5008.78 2329.52,-4957.78
  rectangle net NetLED1E_2: 2311.54,-4486.78 2342.54,-4398.78
  rectangle net MeasureE: 2240.52,-4584.78 2274.52,-4442.78
  rectangle net -VCC_3V3: 1916.52,-4736.78 1944.52,-4710.78
  rectangle net NetR11E_1: 1879.29,-4419.42 1957.52,-4399.92
  rectangle net -VCC_3V3: 1912.52,-5113.78 2049.52,-5080.78
  region net VCC_3V3: 2008.52,-5249.78 2008.52,-5307.78 2059.52,-5307.78 2059.52,-5249.78
  rectangle net VREF_GND: 2018.52,-5356.78 2079.52,-5318.28
  rectangle net *rgE: 2177.54,-5156.78 2289.52,-5125.78
  rectangle net #rgE: 2177.54,-5206.78 2290.52,-5170.78
  rectangle net VREF_GND: 1893.52,-5162.78 2030.52,-5121.78
  rectangle net VCC_3V3: 1883.52,-5265.78 2059.52,-5231.78
  rectangle net -VCC_3V3: 1859.52,-4531.78 1912.29,-4434.78
  region net -VCC_3V3: 2016.89,-5373.78 2016.89,-5471.78 2052.52,-5471.78 2052.52,-5373.78
  rectangle net NetC1E_2: 1960.52,-5408.78 2000.52,-5277.78
  rectangle net Measure*E: 1929.52,-5039.78 1992.52,-4985.78
  rectangle net VREF_GND: 2153.52,-4937.78 2213.52,-4911.78
  rectangle net SMOOTHE: 2029.54,-4618.78 2084.54,-4590.78
  rectangle net Measure*E: 1943.52,-4858.78 2014.52,-4797.78
  rectangle net Measure*E: 1973.52,-5052.78 2027.52,-4891.78
  rectangle net IN2PE: 2057.52,-5050.78 2137.52,-4964.78
  rectangle net IN2PE: 2057.52,-5050.78 2145.52,-5023.78
  rectangle net NetC4E_2: 2100.54,-4617.78 2156.54,-4571.78
  rectangle net RECTE: 2171.63,-4660.4 2202.63,-4591.78
  rectangle net OUT1E: 2148.52,-5000.78 2239.52,-4944.78
  rectangle net NetR3E_1: 2250.54,-4944.78 2280.54,-4798.78
  rectangle net IN2ND: 341.35,-4751.78 380.37,-4695.78
  rectangle net NetC1D_2: 304.35,-4730.78 335.35,-4708.78
  rectangle net NetD1D_2: 293.35,-4788.78 376.35,-4764.78
  rectangle net NetC3D_2: 333.37,-4857.78 380.37,-4837.78
  rectangle net NetC3D_2: 333.37,-4896.78 380.37,-4837.78
  rectangle net NetR3D_1: 288.37,-4828.28 377.37,-4798.78
  rectangle net RECTD: 345.35,-4679.78 376.35,-4641.78
  rectangle net RECTD: 210.35,-4661.78 376.35,-4641.78
  rectangle net NetD1D_2: 319.35,-5008.78 367.35,-4957.78
  rectangle net NetLED1D_2: 349.37,-4486.78 380.37,-4398.78
  rectangle net MeasureD: 278.35,-4584.78 312.35,-4442.78
  rectangle net -VCC_3V3: -45.65,-4736.78 -17.65,-4710.78
  rectangle net NetR11D_1: -82.87,-4419.42 -4.65,-4399.92
  rectangle net VREF_GND: -36.67,-4475.78 23.35,-4436.78
  rectangle net -VCC_3V3: -49.65,-5113.78 87.35,-5080.78
  region net VCC_3V3: 46.35,-5249.78 46.35,-5307.78 97.35,-5307.78 97.35,-5249.78
  rectangle net VREF_GND: 56.35,-5356.78 117.35,-5318.28
  rectangle net *rgD: 215.37,-5156.78 327.35,-5125.78
  rectangle net #rgD: 215.37,-5206.78 328.35,-5170.78
  rectangle net VREF_GND: -68.65,-5162.78 68.35,-5121.78
  rectangle net VCC_3V3: -78.65,-5265.78 97.35,-5231.78
  rectangle net -VCC_3V3: -102.65,-4531.8 -49.87,-4434.78
  region net -VCC_3V3: 54.72,-5373.78 54.72,-5471.78 90.35,-5471.78 90.35,-5373.78
  rectangle net NetC1D_2: -1.65,-5408.78 38.35,-5277.78
  rectangle net Measure*D: -32.65,-5039.78 30.35,-4985.78
  rectangle net VREF_GND: 191.35,-4937.78 251.35,-4911.78
  rectangle net SMOOTHD: 67.37,-4618.78 122.37,-4590.78
  rectangle net Measure*D: -18.65,-4858.78 52.35,-4797.78
  rectangle net Measure*D: 11.35,-5052.78 65.35,-4891.78
  rectangle net IN2PD: 95.35,-5050.78 175.35,-4964.78
  rectangle net IN2PD: 95.35,-5050.78 183.35,-5023.78
  rectangle net NetC4D_2: 138.37,-4617.78 194.37,-4571.78
  rectangle net RECTD: 209.47,-4660.4 240.47,-4591.78
  rectangle net OUT1D: 186.35,-5000.78 277.35,-4944.78
  rectangle net NetR3D_1: 288.37,-4944.78 318.37,-4798.78
  rectangle net IN2NC: -1602.13,-4751.78 -1563.11,-4695.78
  rectangle net NetC1C_2: -1639.13,-4730.78 -1608.13,-4708.78
  rectangle net NetD1C_2: -1650.13,-4788.78 -1567.13,-4764.78
  rectangle net NetC3C_2: -1610.11,-4857.78 -1563.11,-4837.78
  rectangle net NetC3C_2: -1610.11,-4896.78 -1563.11,-4837.78
  rectangle net NetR3C_1: -1655.11,-4828.28 -1566.11,-4798.78
  rectangle net RECTC: -1598.13,-4679.78 -1567.13,-4641.78
  rectangle net RECTC: -1733.13,-4661.78 -1567.13,-4641.78
  rectangle net NetD1C_2: -1624.13,-5008.78 -1576.13,-4957.78
  rectangle net NetLED1C_2: -1594.11,-4486.78 -1563.11,-4398.78
  rectangle net MeasureC: -1665.13,-4584.78 -1631.13,-4442.78
  rectangle net -VCC_3V3: -1989.13,-4736.78 -1961.13,-4710.78
  rectangle net NetR11C_1: -2026.36,-4419.42 -1948.13,-4399.92
  rectangle net VREF_GND: -1980.15,-4475.78 -1920.13,-4436.78
  rectangle net -VCC_3V3: -1993.13,-5113.78 -1856.13,-5080.78
  region net VCC_3V3: -1897.13,-5249.78 -1897.13,-5307.78 -1846.13,-5307.78 -1846.13,-5249.78
  rectangle net VREF_GND: -1887.13,-5356.78 -1826.13,-5318.28
  rectangle net *rgC: -1728.11,-5156.78 -1616.13,-5125.78
  rectangle net #rgC: -1728.11,-5206.78 -1615.13,-5170.78
  rectangle net VREF_GND: -2012.13,-5162.78 -1875.13,-5121.78
  rectangle net VCC_3V3: -2022.13,-5265.78 -1846.13,-5231.78
  rectangle net -VCC_3V3: -2046.13,-4531.95 -1993.36,-4434.78
  region net -VCC_3V3: -1888.76,-5373.78 -1888.76,-5471.78 -1853.13,-5471.78 -1853.13,-5373.78
  rectangle net NetC1C_2: -1945.13,-5408.78 -1905.13,-5277.78
  rectangle net Measure*C: -1976.13,-5039.78 -1913.13,-4985.78
  rectangle net VREF_GND: -1752.13,-4937.78 -1692.13,-4911.78
  rectangle net SMOOTHC: -1876.11,-4618.78 -1821.11,-4590.78
  rectangle net Measure*C: -1962.13,-4858.78 -1891.13,-4797.78
  rectangle net Measure*C: -1932.13,-5052.78 -1878.13,-4891.78
  rectangle net IN2PC: -1848.13,-5050.78 -1768.13,-4964.78
  rectangle net IN2PC: -1848.13,-5050.78 -1760.13,-5023.78
  rectangle net NetC4C_2: -1805.11,-4617.78 -1749.11,-4571.78
  rectangle net RECTC: -1734.02,-4660.4 -1703.02,-4591.78
  rectangle net OUT1C: -1757.13,-5000.78 -1666.13,-4944.78
  rectangle net NetR3C_1: -1655.11,-4944.78 -1625.11,-4798.78
  rectangle net IN2NB: -2701.92,-4751.78 -2662.9,-4695.78
  rectangle net NetC1B_2: -2738.92,-4730.78 -2707.92,-4708.78
  rectangle net NetD1B_2: -2749.92,-4788.78 -2666.92,-4764.78
  rectangle net NetC3B_2: -2709.9,-4857.78 -2662.9,-4837.78
  rectangle net NetC3B_2: -2709.9,-4896.78 -2662.9,-4837.78
  rectangle net NetR3B_1: -2754.9,-4828.28 -2665.9,-4798.78
  rectangle net RECTB: -2697.92,-4679.78 -2666.92,-4641.78
  rectangle net RECTB: -2832.92,-4661.78 -2666.92,-4641.78
  rectangle net NetD1B_2: -2723.92,-5008.78 -2675.92,-4957.78
  rectangle net NetLED1B_2: -2693.9,-4486.78 -2662.9,-4398.78
  rectangle net MeasureB: -2764.92,-4584.78 -2730.92,-4442.78
  rectangle net -VCC_3V3: -3088.92,-4736.78 -3060.92,-4710.78
  rectangle net NetR11B_1: -3126.14,-4419.42 -3047.92,-4399.92
  rectangle net VREF_GND: -3079.93,-4475.78 -3019.92,-4436.78
  rectangle net -VCC_3V3: -3092.92,-5113.78 -2955.92,-5080.78
  region net VCC_3V3: -2996.92,-5249.78 -2996.92,-5307.78 -2945.92,-5307.78 -2945.92,-5249.78
  rectangle net VREF_GND: -2986.92,-5356.78 -2925.92,-5318.28
  rectangle net *rgB: -2827.9,-5156.78 -2715.92,-5125.78
  rectangle net #rgB: -2827.9,-5206.78 -2714.92,-5170.78
  rectangle net VREF_GND: -3111.92,-5162.78 -2974.92,-5121.78
  rectangle net VCC_3V3: -3121.92,-5265.78 -2945.92,-5231.78
  rectangle net -VCC_3V3: -3145.92,-4531.9 -3093.14,-4434.78
  region net -VCC_3V3: -2988.55,-5373.78 -2988.55,-5471.78 -2952.92,-5471.78 -2952.92,-5373.78
  rectangle net NetC1B_2: -3044.92,-5408.78 -3004.92,-5277.78
  rectangle net Measure*B: -3075.92,-5039.78 -3012.92,-4985.78
  rectangle net VREF_GND: -2851.92,-4937.78 -2791.92,-4911.78
  rectangle net SMOOTHB: -2975.9,-4618.78 -2920.9,-4590.78
  rectangle net Measure*B: -3061.92,-4858.78 -2990.92,-4797.78
  rectangle net Measure*B: -3031.92,-5052.78 -2977.92,-4891.78
  rectangle net IN2PB: -2947.92,-5050.78 -2867.92,-4964.78
  rectangle net IN2PB: -2947.92,-5050.78 -2859.92,-5023.78
  rectangle net NetC4B_2: -2904.9,-4617.78 -2848.9,-4571.78
  rectangle net RECTB: -2833.8,-4660.4 -2802.8,-4591.78
  rectangle net OUT1B: -2856.92,-5000.78 -2765.92,-4944.78
  rectangle net NetR3B_1: -2754.9,-4944.78 -2724.9,-4798.78
  rectangle net IN2NA: -3270.89,-4751.78 -3231.87,-4695.78
  rectangle net NetC1A_2: -3307.89,-4730.78 -3276.89,-4708.78
  rectangle net NetD1A_2: -3318.89,-4788.78 -3235.89,-4764.78
  rectangle net NetC3A_2: -3278.87,-4857.78 -3231.87,-4837.78
  rectangle net NetC3A_2: -3278.87,-4896.78 -3231.87,-4837.78
  rectangle net NetR3A_1: -3323.87,-4828.28 -3234.87,-4798.78
  rectangle net RECTA: -3266.89,-4679.78 -3235.89,-4641.78
  rectangle net RECTA: -3401.89,-4661.78 -3235.89,-4641.78
  rectangle net NetD1A_2: -3292.89,-5008.78 -3244.89,-4957.78
  rectangle net NetLED1A_2: -3262.87,-4486.78 -3231.87,-4398.78
  rectangle net MeasureA: -3333.89,-4584.78 -3299.89,-4442.78
  rectangle net -VCC_3V3: -3657.89,-4736.78 -3629.89,-4710.78
  rectangle net NetR11A_1: -3695.12,-4419.42 -3616.89,-4399.92
  rectangle net VREF_GND: -3648.91,-4475.78 -3588.89,-4436.78
  rectangle net -VCC_3V3: -3661.89,-5113.78 -3524.89,-5080.78
  region net VCC_3V3: -3565.89,-5249.78 -3565.89,-5307.78 -3514.89,-5307.78 -3514.89,-5249.78
  rectangle net VREF_GND: -3555.89,-5356.78 -3494.89,-5318.28
  rectangle net *rgA: -3396.87,-5156.78 -3284.89,-5125.78
  rectangle net #rgA: -3396.87,-5206.78 -3283.89,-5170.78
  rectangle net VREF_GND: -3680.89,-5162.78 -3543.89,-5121.78
  rectangle net VCC_3V3: -3690.89,-5265.78 -3514.89,-5231.78
  rectangle net -VCC_3V3: -3714.89,-4531.88 -3662.12,-4434.78
  region net -VCC_3V3: -3557.52,-5373.78 -3557.52,-5471.78 -3521.89,-5471.78 -3521.89,-5373.78
  rectangle net NetC1A_2: -3613.89,-5408.78 -3573.89,-5277.78
  rectangle net Measure*A: -3644.89,-5039.78 -3581.89,-4985.78
  rectangle net VREF_GND: -3420.89,-4937.78 -3360.89,-4911.78
  rectangle net SMOOTHA: -3544.87,-4618.78 -3489.87,-4590.78
  rectangle net Measure*A: -3630.89,-4858.78 -3559.89,-4797.78
  rectangle net Measure*A: -3600.89,-5052.78 -3546.89,-4891.78
  rectangle net IN2PA: -3516.89,-5050.78 -3436.89,-4964.78
  rectangle net IN2PA: -3516.89,-5050.78 -3428.89,-5023.78
  rectangle net NetC4A_2: -3473.87,-4617.78 -3417.87,-4571.78
  rectangle net RECTA: -3402.78,-4660.4 -3371.78,-4591.78
  rectangle net OUT1A: -3425.89,-5000.78 -3334.89,-4944.78
  rectangle net NetR3A_1: -3323.87,-4944.78 -3293.87,-4798.78

## Silkscreen, mask and mechanical layers (free items; w line width, h text height)
Top Overlay:
  circle w5: c275.3,-500.42 r6
  circle w5: c257.35,-564.72 r6
  circle w5: c278.62,-579.74 r6
  circle w5: c377.7,-605.65 r5
  circle w5: c388.69,-620.56 r5
  circle w5: c397.32,-637.05 r5
  circle w5: c406.74,-653.53 r5
  circle w5: c383.74,-481.61 r7.5
  circle w5: c333.41,-527.93 r5
  circle w5: c340.41,-544.41 r5
  circle w5: c349.72,-560.11 r5
  lines w3: 324.86,0 324.86,0
  lines w5: -3277.3,-4695.77 -3277.3,-4723.36 ccw(c-3267.87,-4723.36) -3267.87,-4732.78 ; -2708.32,-4695.77 -2708.32,-4723.36 ccw(c-2698.9,-4723.36) -2698.9,-4732.78 ; -1608.54,-4695.77 -1608.54,-4723.36 ccw(c-1599.11,-4723.36) -1599.11,-4732.78 ; 257.35,-558.72 268.35,-547.72 277.35,-538.72 313.35,-538.72 313.35,-526.57 298.26,-526.57 295.21,-526.57 288.35,-519.72 277.35,-507.72 ; 263.35,-564.72 281.12,-546.96 281.27,-546.96 313.35,-546.96 313.35,-557.45 294.21,-576.6 284.35,-576.6 ; 282.35,-501.72 298.54,-518.9 ; 284.35,-583.83 298.24,-583.83 312.35,-569.72 321.41,-560.67 321.41,-555.75 321.41,-485.72 368.67,-485.72 369.83,-484.57 ; 306.37,-518.9 298.54,-518.9 ; 322.47,-653.53 401.74,-653.53 ; 327.18,-637.05 392.32,-637.05 ; 334.94,-4695.77 334.94,-4723.36 ccw(c344.37,-4723.36) 344.37,-4732.78 ; 335.03,-621.35 383.75,-621.35 ; 338.41,-527.93 391.56,-527.93 ; 345.41,-544.41 383.7,-544.41 ; 349.16,-605.65 372.7,-605.65 ; 354.72,-560.11 368.79,-560.11 ; 360.15,-591.52 370.36,-591.52 ; 369.73,-484.08 cw(c383.74,-481.61) 369.73,-479.14 ; 369.83,-478.65 369.76,-478.72 368.76,-477.72 321.41,-477.72 321.41,-423.67 344.35,-400.72 383.51,-400.72 407.65,-425.35 407.65,-515.37 cw(c356.1,-515.37) 392.55,-551.82 ; 372.27,-489.64 ccw(c383.74,-481.61) 375.71,-493.08 ; 372.27,-473.58 cw(c383.74,-481.61) 375.71,-470.14 ; 377.02,-565.63 348.28,-581.53 324.69,-603.54 ccw(c378.6,-657.46) 302.35,-657.46 315.41,-657.46 cw(c390.27,-657.46) 337.33,-604.52 362.12,-579.74 392.34,-552.26 ; 381.27,-495.62 ccw(c383.74,-481.61) 386.21,-495.62 ; 381.27,-467.6 cw(c383.74,-481.61) 386.21,-467.6 ; 391.77,-493.08 ccw(c383.74,-481.61) 395.21,-489.64 ; 391.77,-470.14 cw(c383.74,-481.61) 395.21,-473.58 ; 392.67,-551.94 409.62,-534.99 ccw(c393.35,-518.72) 416.35,-518.72 416.35,-457.72 416.35,-421.72 411.35,-416.72 387.35,-392.72 340.35,-392.72 313.35,-419.72 313.35,-518.9 298.53,-518.9 ; 397.75,-484.08 ccw(c383.74,-481.61) 397.75,-479.14 ; 2297.11,-4695.77 2297.11,-4723.36 ccw(c2306.54,-4723.36) 2306.54,-4732.78 ; 3109.82,-4695.78 3109.82,-4723.36 ccw(c3119.25,-4723.36) 3119.25,-4732.79 ; 3846.57,-4695.77 3846.57,-4723.36 ccw(c3856,-4723.36) 3856,-4732.78 ; 4516.04,-4695.77 4516.04,-4723.36 ccw(c4525.47,-4723.36) 4525.47,-4732.78
  lines w10: 36.46,-751.76 71.01,-679.53 74.93,-679.53 107.9,-750.97 ; 127.83,-679.53 162.37,-679.53 cw(c162.37,-716.49) 199.33,-716.49 ; 129.79,-722.71 129.79,-750.97 160.8,-750.97 166.33,-750.97 ccw(c166.33,-718) 199.3,-718 199.3,-716.49 ; 217.72,-739.2 ccw(c231.07,-739.2) 231.07,-752.54 ; 250.3,-752.54 266,-752.54 ccw(c266,-737.63) 280.92,-737.63 280.92,-736.06 ccw(c264.43,-736.06) 264.43,-719.57 239.7,-719.57 cw(c239.7,-699.16) 219.29,-699.16 cw(c238.92,-699.16) 238.92,-679.53 253.44,-679.53 ; 286.23,-679.53 352.96,-679.53 ; 319.59,-754.9 319.59,-705.76 ; 374.34,-679.53 413.59,-679.53 cw(c413.59,-701.52) 435.57,-701.52 cw(c415.94,-701.52) 415.94,-721.14 ; 376.69,-753.33 376.69,-721.14 410.45,-721.14 415.94,-721.14 ; 436.76,-754.3 415.94,-721.14 ; 463.05,-728.99 ccw(c487.38,-728.99) 487.38,-753.33 494.84,-753.33 500.34,-753.33 ; 463.05,-728.21 463.05,-709.76 ; 463.05,-695.76 463.05,-679.53 ; 501.51,-753.33 ccw(c501.51,-728.21) 526.64,-728.21 ; 526.64,-707.76 526.64,-679.53 ; 556.07,-754.11 556.07,-680.32 599.64,-731.35 643.21,-680.32 642.82,-754.11
  text "ELECTRODE # 8" at -3418.59,-4018.98 h100 r90
  text "ELECTRODE # 7" at -2850.59,-4018.98 h100 r90
  text "ELECTRODE # 6" at -1750.59,-4018.98 h100 r90
  text "ELECTRODE # 3" at 2967.41,-4018.98 h100 r90
  text "ELECTRODE # 2" at 3704.41,-4018.98 h100 r90
  text "ELECTRODE # 1" at 4373.47,-4018.98 h100 r90
  text "ELECTRODE # 4" at 2155.41,-4020.81 h100 r90
  text "ELECTRODE # 5" at 192.41,-4021.75 h100 r90
  text "Measure" at -1890,-4315 h35
  text "Measure" at 2829,-4315 h35
  text "Measure" at -3556,-4316 h35
  text "Measure" at -2987,-4316 h35
  text "Measure" at 53,-4316 h35
  text "Measure" at 2016,-4316 h35
  text "Measure" at 3566,-4316 h35
  text "Measure" at 4237.16,-4316.39 h35
  text "Measure#" at -1916,-5447.61 h35
  text "Measure#" at 1990,-5447.61 h35
  text "Measure#" at 2803,-5447.61 h35
  text "Measure#" at 3540,-5447.61 h35
  text "Measure#" at 4209,-5447.61 h35
  text "Measure#" at -3584,-5448.61 h35
  text "Measure#" at -3015,-5448.61 h35
  text "Measure#" at 28,-5448.61 h35
Board Outline:
  drawing of 168 lines, arcs and shapes, not listed
Fabrication:
  drawing of 264 lines, arcs and shapes, not listed
  text "Layer" at 5070.58,1240 h60
  text "Name" at 5480.49,1240 h60
  text "Material" at 6410.23,1240 h60
  text "Thickness" at 7270,1240 h60
  text "Constant" at 7919.84,1240 h60
  text "Flex Layer Stack" at 8489.7,1240 h60
  text "Top Overlay" at 5480.49,1120 h60
  text "Top Solder" at 5480.49,1000 h60
  text "Solder Resist" at 6410.23,1000 h60
  text "0.013mm" at 7270,1000 h60
  text "3.5" at 7919.84,1000 h60
  text "1" at 5070.58,880 h60
  text "Top Layer" at 5480.49,880 h60
  text "0.035mm" at 7270,880 h60
  text "Stiffener Area" at 1579.75,833.89 h60
  text "Dielectric 1" at 5480.49,760 h60
  text "Flex" at 6410.23,760 h60
  text "0.020mm" at 7270,760 h60
  text "4.8" at 7919.84,760 h60
  text "Material : Polyimide" at 1419.75,749.88 h60
  text "2" at 5070.58,640 h60
  text "Bottom Layer" at 5480.49,640 h60
  text "0.035mm" at 7270,640 h60
  text "Bottom Solder" at 5480.49,520 h60
  text "Solder Resist" at 6410.23,520 h60
  text "0.013mm" at 7270,520 h60
  text "3.5" at 7919.84,520 h60
  text "Bottom Overlay" at 5480.49,400 h60
  text "Total board thickness:" at 5070.58,280 h60
  text "0.116mm" at 7270,280 h60
Drill Drawing:
  circle w10: c-1929.38,2405.83 r33.33
  lines w10: -1962.71,2139.17 -1896.04,2139.17 -1929.38,2072.5 -1962.71,2139.17 ; -1962.71,2222.5 -1896.04,2222.5 -1896.04,2289.17 -1962.71,2289.17 -1962.71,2222.5
  lines w15: -2022.5,2027.5 8508.58,2027.5 ; -2022.5,2477.5 8508.58,2477.5 ; -1471.62,1877.5 -1471.62,2627.5 ; -871.78,1877.5 -871.78,2627.5 ; 217.9,1877.5 217.9,2627.5 ; 723.78,1877.5 723.78,2627.5 ; 1457.58,1877.5 1457.58,2627.5 ; 2957.13,1877.5 2957.13,2627.5 ; 3546.98,1877.5 3546.98,2627.5 ; 4292.78,1877.5 4292.78,2627.5 ; 4942.6,1877.5 4942.6,2627.5 ; 5796.37,1877.5 5796.37,2627.5 ; 7129.98,1877.5 7129.98,2627.5 ; -2022.5,1877.5 8508.58,1877.5 8508.58,2627.5 -2022.5,2627.5 -2022.5,1877.5
  text "Symbol" at -1932.5,2522.5 h72
  text "Count" at -1426.62,2522.5 h72
  text "Hole Size" at -826.78,2522.5 h72
  text "Plated" at 262.9,2522.5 h72
  text "Hole Type" at 768.78,2522.5 h72
  text "Drill Layer Pair" at 1502.58,2522.5 h72
  text "Via/Pad" at 3002.13,2522.5 h72
  text "Pad Shape" at 3591.98,2522.5 h72
  text "Template" at 4337.78,2522.5 h72
  text "Description" at 4987.6,2522.5 h72
  text "Hole Tolerance (+)" at 5841.37,2522.5 h72
  text "Hole Tolerance (-)" at 7174.98,2522.5 h72
  text "16" at -1426.62,2372.5 h60
  text "39.37mil (1.000mm)" at -826.78,2372.5 h60
  text "NPTH" at 262.9,2372.5 h60
  text "Round" at 768.78,2372.5 h60
  text "Top Layer - Bottom Layer" at 1502.58,2372.5 h60
  text "Pad" at 3002.13,2372.5 h60
  text "Rounded" at 3591.98,2372.5 h60
  text "c0hn100" at 4337.78,2372.5 h60
  text "42" at -1426.62,2222.5 h60
  text "7.87mil (0.200mm)" at -826.78,2222.5 h60
  text "PTH" at 262.9,2222.5 h60
  text "Round" at 768.78,2222.5 h60
  text "Top Layer - Bottom Layer" at 1502.58,2222.5 h60
  text "Via" at 3002.13,2222.5 h60
  text "Rounded" at 3591.98,2222.5 h60
  text "v35h20" at 4337.78,2222.5 h60
  text "304" at -1426.62,2072.5 h60
  text "11.81mil (0.300mm)" at -826.78,2072.5 h60
  text "PTH" at 262.9,2072.5 h60
  text "Round" at 768.78,2072.5 h60
  text "Top Layer - Bottom Layer" at 1502.58,2072.5 h60
  text "Via" at 3002.13,2072.5 h60
  text "Rounded" at 3591.98,2072.5 h60
  text "(Mixed)" at 4337.78,2072.5 h60
  text "362 Total" at -1426.62,1922.5 h60

## Dimensions
-3718.39,-5286 to 4585.45,-5283.79 on Dimension
649.72,0 to 4269.59,-5482.84 on Dimension
2310.57,1215.68 to 2592.39,137.45 on Fabrication
1121.14,943.44 to 2844.75,945.87 on Fabrication
8.18,-167.01 to 8.18,-4.01 on Dimension
649.72,0 to 0,0 on Dimension
629.99,-83.01 to 19.75,-83.01 on Dimension